# Altium PCB CW341_KintexUSTarget.PcbDoc (part 6 of 7)
Units mil, origin at the board's own origin, x right, y up, seen from the top; angles counter-clockwise.
Board outline 4566.97 x 5485 mil, 6 copper layers (Top Layer, Layer 2 (GND), Layer 3 (sig), Layer 4 (sig), Layer 5 (PWR), Bottom Layer), stack 61.068 mil thick; 157 components, 262 nets, 1869 pads, 1478 vias.
Unrouted connection lines stored in the file: 128.
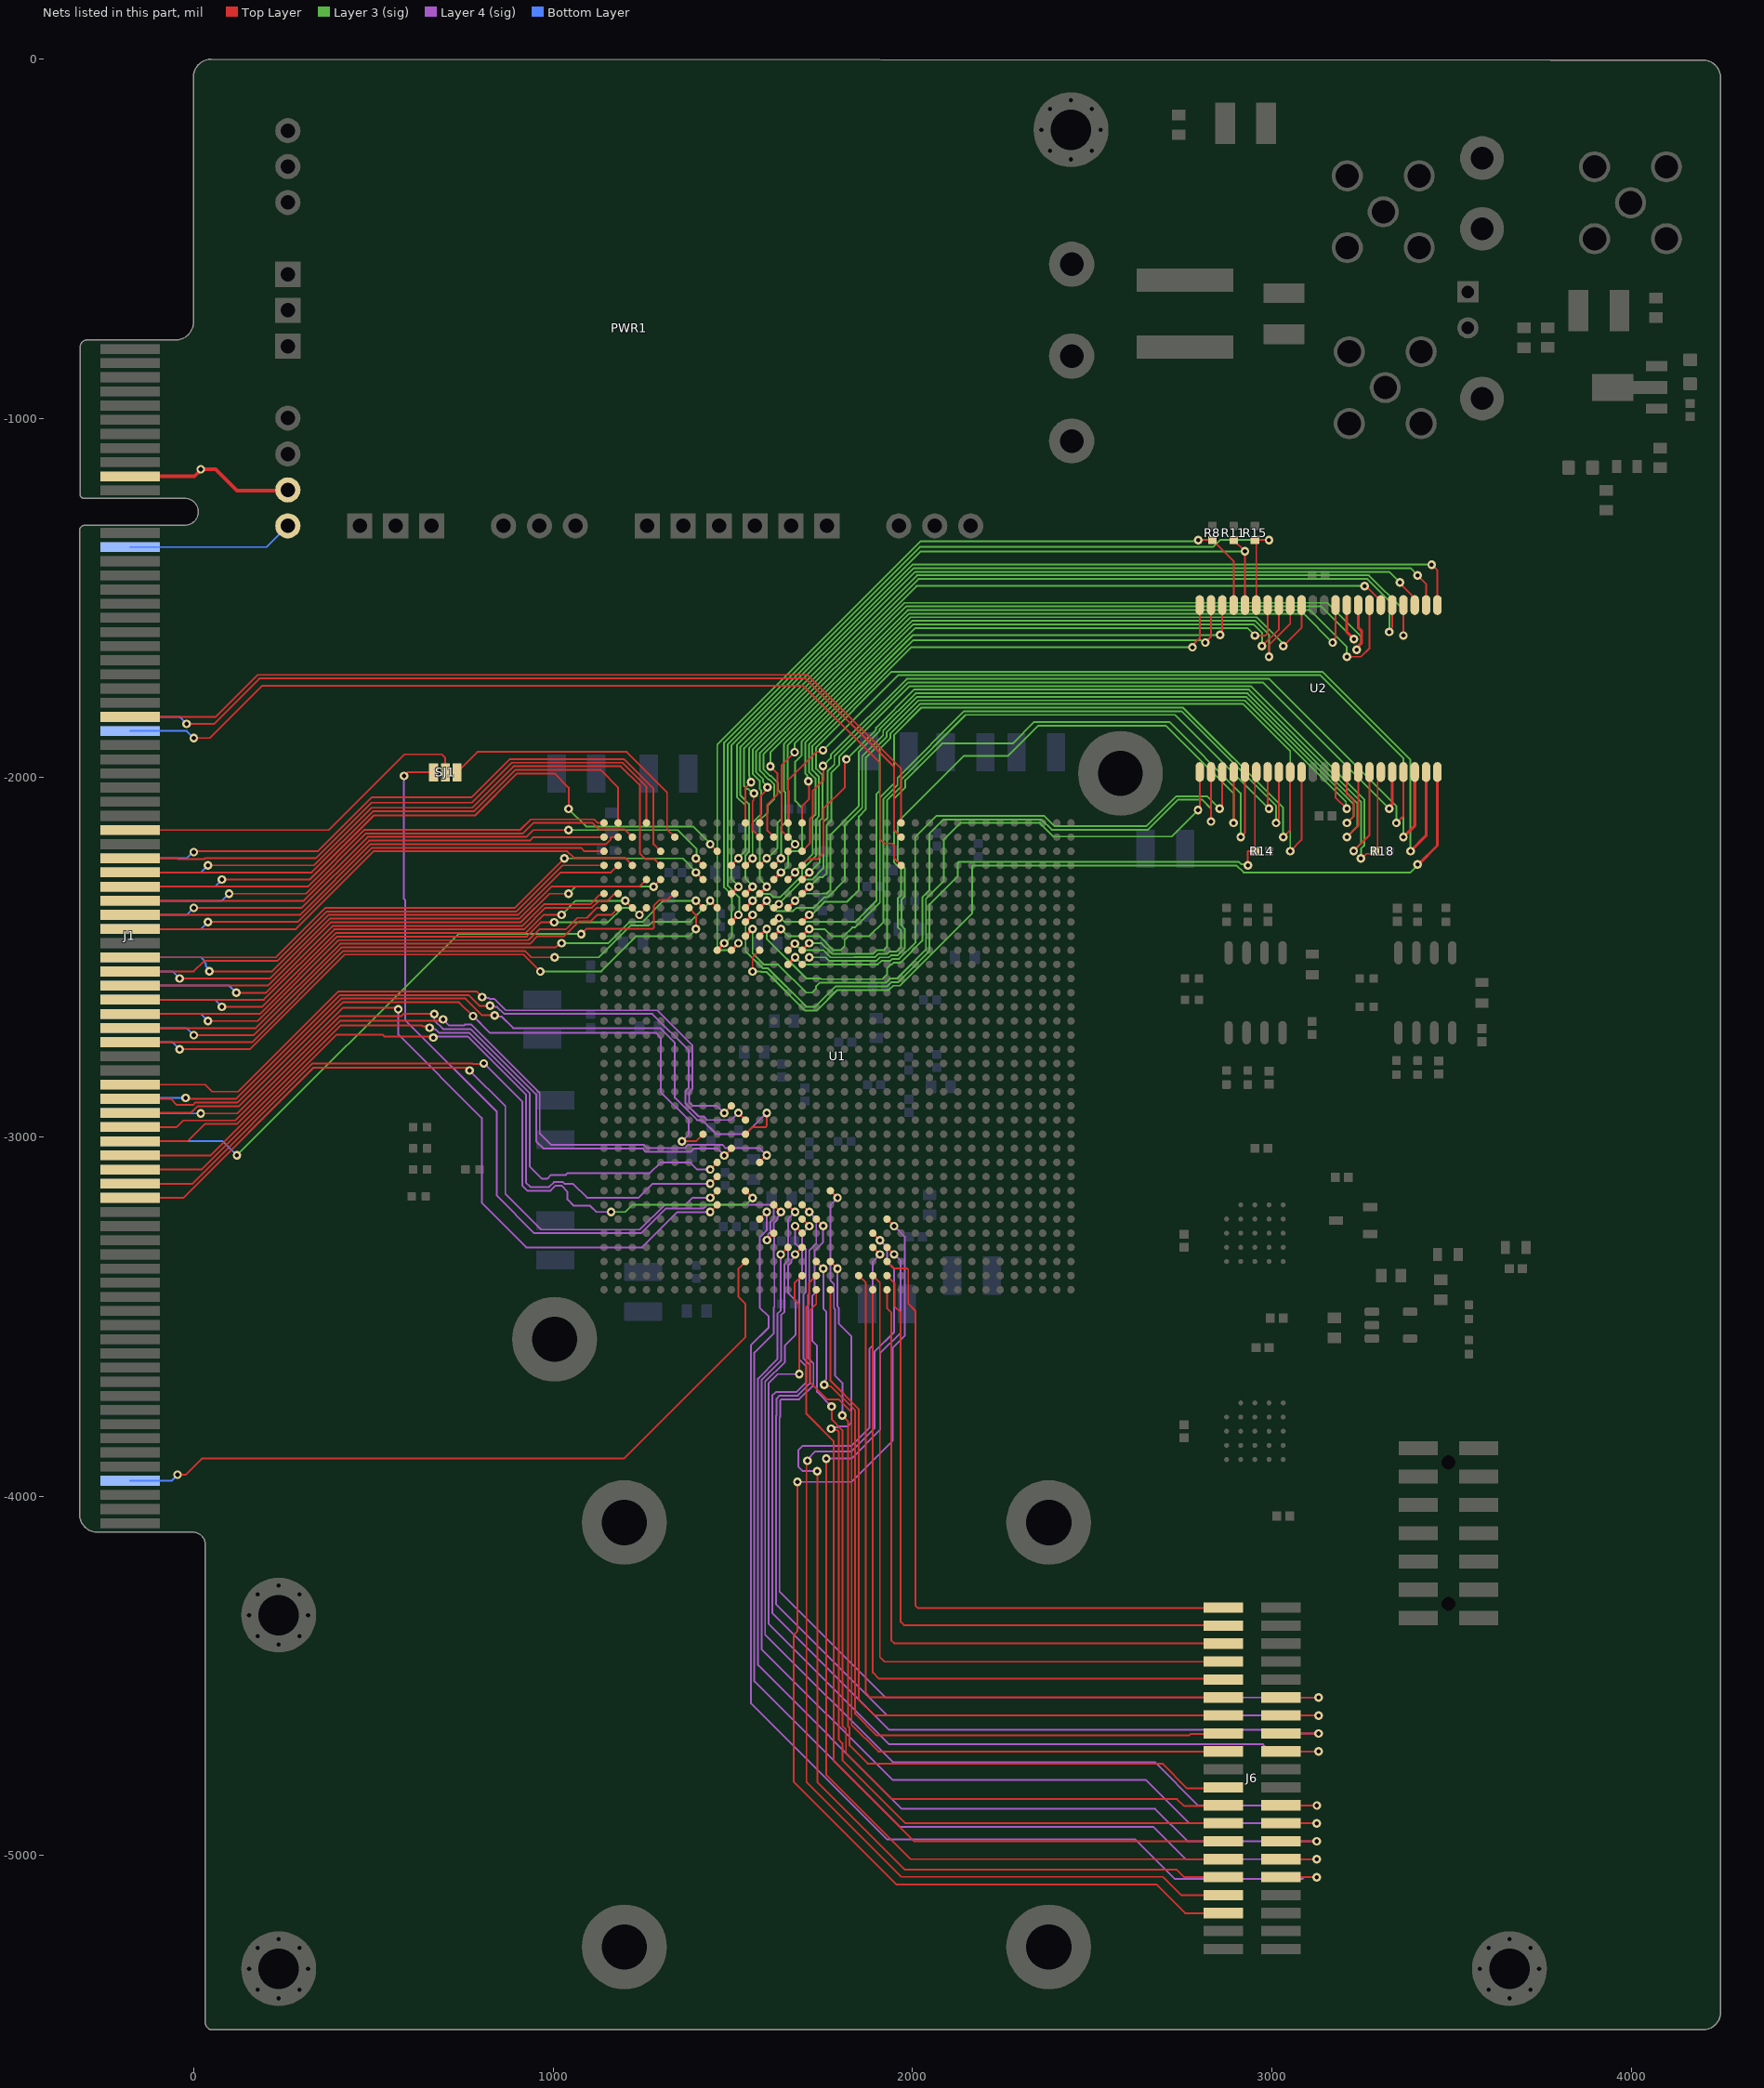
[diagram p9: the nets of this part, all layers, seen from the top]

## Via types
v1: diameter 24, hole 12, Top Layer to Bottom Layer, tented both sides, 1463 vias
v2: diameter 24, hole 10, Top Layer to Bottom Layer, tented both sides, 15 vias

## Nets (pads, with @x,y where several pads share a name; then routed paths per layer and width w, separated by ;. In a path a pad name is that pad's centre, name@x,y a point inside that pad or via, vN(x,y) a via of type N, cw(c..) or ccw(c..) an arc to the next point about the centre after c; other vN are vias at no path point) (continued)
OT_IOC3: J1.B51 U1.P25 | length 2050.2
  Top Layer w5: J1.B51@-177.17,-2854.33 31.48,-2854.33 50.98,-2873.83 123.74,-2873.83 402.57,-2595 786.78,-2595 v1(802.33,-2610.56) ; v1(1476.38,-2933.07) U1.P25@1496.06,-2913.39
  Layer 4 (sig) w5: v1(802.33,-2610.56) 805.33,-2613.56 821.83,-2613.56 823.62,-2615.34 835.8,-2615.34 867.96,-2647.51 1289.92,-2647.51 1387.77,-2745.36 1387.77,-2866.55 1378.14,-2876.18 1378.14,-2901.78 1389.93,-2913.57 1456.88,-2913.57 v1(1476.38,-2933.07)
OT_IOC4: J1.A52 U1.N24 | length 2094.2
  Top Layer w5: v1(-22.12,-2891.26) -19.69,-2893.7 118.01,-2893.7 406.72,-2605 765.16,-2605 795,-2634.84 v1(824.8,-2634.84) ; v1(1515.49,-2932.81) U1.N24@1535.43,-2952.76
  Layer 4 (sig) w5: v1(824.8,-2634.84) 827.95,-2637.99 844.3,-2637.99 863.98,-2657.67 1276.25,-2657.67 1377.77,-2759.19 1377.77,-2862.41 1368.14,-2872.04 1368.14,-2905.92 1405.16,-2942.94 1418.72,-2942.94 1428.35,-2952.57 1495.73,-2952.57 v1(1515.49,-2932.81)
  Bottom Layer w5: J1.A52@-177.17,-2893.7 -174.73,-2891.26 v1(-22.12,-2891.26)
OT_IOC5: J1.B52 U1.M24 | length 2275.8
  Top Layer w5: J1.B52@-177.17,-2893.7 -64.05,-2893.7 -46.99,-2910.76 -2.06,-2910.76 5,-2903.7 122.16,-2903.7 410.86,-2615 756.37,-2615 802.78,-2661.42 v1(837.6,-2661.42) ; U1.M24@1535.43,-2992.13 1555.12,-2972.44 1591.56,-2972.44 1594.49,-2969.51 v1(1594.49,-2933.07)
  Layer 4 (sig) w5: v1(837.6,-2661.42) 841.11,-2664.93 857.1,-2664.93 889.02,-2696.85 1297.24,-2696.85 1338.77,-2738.37 1338.77,-2890.69 1401.02,-2952.94 1414.58,-2952.94 1453.58,-2991.94 1535.62,-2991.94 v1(1594.49,-2933.07)
OT_IOC6: J1.B53 U1.M27 | length 2041
  Top Layer w5: J1.B53@-177.17,-2933.07 -8.07,-2933.07 10,-2915 125,-2915 415,-2625 738.21,-2625 776.69,-2663.48 v1(777.27,-2663.48) ; v1(1358.27,-3011.81) 1397.64,-3011.81 U1.M27@1417.32,-2992.13
  Layer 4 (sig) w5: v1(777.27,-2663.48) 823.74,-2709.95 1285.79,-2709.95 1299.4,-2723.56 1299.4,-2874.57 1377.77,-2952.94 1377.77,-2992.31 v1(1358.27,-3011.81)
OT_IOC7: J1.B54 U1.L25 | length 2071.7
  Top Layer w5: J1.B54@-177.17,-2972.44 -47.44,-2972.44 -29,-2954 116,-2954 406,-2664 577.26,-2664 583.78,-2657.48 v1(669.29,-2657.48) ; v1(1476.06,-3051.44) 1477.17,-3052.55 1477.41,-3052.55 1496.06,-3033.89 U1.L25@1496.06,-3031.5
  Layer 4 (sig) w5: v1(669.29,-2657.48) 669.29,-2675.4 693.67,-2699.78 770.64,-2699.78 952.88,-2882.01 952.88,-3011.48 973.07,-3031.68 1248.23,-3031.68 1257.86,-3041.31 1382.75,-3041.31 1392.33,-3031.73 1456.35,-3031.73 v1(1476.06,-3051.44)
OT_IOC8: J1.B55 U1.K23 | length 2173.6
  Top Layer w5: J1.B55@-177.17,-3011.81 -16.81,-3011.81 31,-2964 120.14,-2964 407.69,-2676.45 660.69,-2676.45 661.21,-2676.98 677.37,-2676.98 678.13,-2676.22 690.41,-2676.22 v1(694.05,-2672.58) ; U1.K23@1574.8,-3070.87 v1(1594.51,-3051.18)
  Layer 4 (sig) w5: v1(694.05,-2672.58) 711.24,-2689.78 752.17,-2689.78 755.1,-2686.85 771.86,-2686.85 962.88,-2877.87 962.88,-2990.43 994.12,-3021.68 1252.38,-3021.68 1262.01,-3031.31 1366.34,-3031.31 1375.93,-3021.73 1470.49,-3021.73 1480.07,-3031.31 1574.63,-3031.31 v1(1594.51,-3051.18)
OT_IOC9: J1.B56 U1.K26 | length 2115
  Top Layer w5: J1.B56@-177.17,-3051.18 47.1,-3051.18 409.31,-2688.98 634.71,-2688.98 638.05,-2692.32 653.08,-2692.32 v1(656.71,-2695.95) ; v1(1437.01,-3090.55) U1.K26@1456.69,-3070.87
  Layer 4 (sig) w5: v1(656.71,-2695.95) 660.35,-2699.59 671.04,-2699.59 672.5,-2701.04 673.49,-2701.04 682.22,-2709.78 766.5,-2709.78 934.57,-2877.84 934.57,-3082.03 968.31,-3115.77 984.22,-3115.77 994.5,-3105.5 1035.71,-3105.5 1040.92,-3100.29 1269.79,-3100.29 1299.03,-3071.05 1381.28,-3071.05 1400.78,-3090.55 v1(1437.01,-3090.55)
OT_IOC10: J1.B57 U1.J26 | length 2159.4
  Top Layer w5: J1.B57@-177.17,-3090.55 21.87,-3090.55 397.43,-2715 526.08,-2715 531.62,-2720.54 663.63,-2720.54 v1(666.38,-2723.29) ; v1(1437.01,-3130.05) 1437.01,-3129.99 1456.69,-3110.3 U1.J26@1456.69,-3110.24
  Layer 4 (sig) w5: v1(666.38,-2723.29) 669.13,-2720.54 763.12,-2720.54 924.57,-2881.98 924.57,-3127.18 936.8,-3139.42 988.86,-3139.42 1002.78,-3125.5 1027.22,-3125.5 1032.22,-3130.5 1055.68,-3130.5 1094.29,-3169.11 1237.99,-3169.11 1277.05,-3130.05 v1(1437.01,-3130.05)
OT_IOC11: J1.B58 U1.H24 | length 2247.7
  Top Layer w5: J1.B58@-177.17,-3129.92 -3.35,-3129.92 331.11,-2795.46 775.79,-2795.46 777.5,-2797.17 v1@807.09,-2797.17 ; U1.H24@1535.43,-3149.61 1535.43,-3149.79 1555.12,-3169.48 v1(1555.12,-3169.66)
  Layer 4 (sig) w5: v1(807.09,-2795.28) 914.57,-2902.76 914.57,-3135.81 928.18,-3149.42 993,-3149.42 1006.92,-3135.5 1023.08,-3135.5 1040.2,-3152.62 1040.2,-3174.08 1057.32,-3191.2 1102.6,-3191.2 1120.07,-3208.66 v1(1161.42,-3208.66)
  Layer 3 (sig) w5: v1(1161.42,-3208.66) 1200.79,-3208.66 1220.29,-3189.16 1535.25,-3189.16 1554.75,-3169.66 v1(1555.12,-3169.66)
OT_IOC12: J1.B59 U1.H26 | length 2155.5
  Top Layer w5: J1.B59@-177.17,-3169.29 -28.58,-3169.29 333.54,-2807.17 v1@767.72,-2807.17 ; v1(1437.5,-3169.38) 1437.5,-3169.09 1456.69,-3149.89 U1.H26@1456.69,-3149.61
  Layer 4 (sig) w5: v1(767.72,-2814.96) 867.19,-2914.43 867.19,-3158.24 966.66,-3257.72 1241.19,-3257.72 1310.11,-3188.79 1368.14,-3188.79 1387.88,-3169.05 1437.17,-3169.05 v1(1437.5,-3169.38)
OT_IOR0_USR_DBG_TMS: J1.A42 U1.AL33 | length 1505.8
  Top Layer w5: v1(43.32,-2539.19) 217.5,-2539.19 374.48,-2382.2 902.19,-2382.2 1020.43,-2263.96 1161.23,-2263.96 U1.AL33@1181.1,-2244.09
  Bottom Layer w5: J1.A42@-177.17,-2500 19.69,-2500 30.69,-2511.01 30.69,-2514.55 33.77,-2517.62 33.77,-2524.5 43.32,-2534.04 v1(43.32,-2539.19)
OT_IOR1_USR_DBG_TDO: J1.B42 U1.AK27 | length 1734.2
  Top Layer w5: J1.B42@-177.17,-2500 228.4,-2500 366.19,-2362.2 893.9,-2362.2 v1(1031.51,-2224.59) ; v1(1397.64,-2263.78) U1.AK27@1417.32,-2283.46
  Layer 3 (sig) w5: v1(1031.51,-2224.59) 1360.54,-2224.59 1397.64,-2261.69 v1(1397.64,-2263.78)
OT_IOR2_USR_DBG_TDI: J1.A43 U1.AK31 | length 1559.3
  Top Layer w5: v1(-39.37,-2559.06) 211.77,-2559.06 378.62,-2392.2 906.33,-2392.2 995.39,-2303.15 1240.16,-2303.15 U1.AK31@1259.84,-2283.46
  Bottom Layer w5: J1.A43@-177.17,-2539.37 -59.06,-2539.37 v1(-39.37,-2559.06)
OT_IOR3_USR_DBG_TCK: J1.B43 U1.AL34 | length 1441.2
  Top Layer w5: J1.B43@-177.17,-2539.37 0,-2539.37 29.37,-2510 232.54,-2510 370.34,-2372.2 898.05,-2372.2 1026.16,-2244.09 U1.AL34@1141.73,-2244.09
OT_IOR4_USR_DBG_TRST: J1.A44 U1.AJ34 | length 1441.2
  Top Layer w5: v1(118.11,-2598.43) 200.68,-2598.43 386.91,-2412.2 914.61,-2412.2 974.61,-2352.2 1103.76,-2352.2 1130.1,-2325.87 1138.7,-2325.87 U1.AJ34@1141.73,-2322.83
  Bottom Layer w5: J1.A44@-177.17,-2578.74 98.43,-2578.74 v1(118.11,-2598.43)
OT_IOR5: J1.B44 U1.AK30 | length 1598.7
  Top Layer w5: J1.B44@-177.17,-2578.74 206.23,-2578.74 382.76,-2402.2 910.47,-2402.2 989.84,-2322.83 v1(1043.31,-2322.83) ; v1(1279.53,-2303.15) U1.AK30@1299.21,-2283.46
  Layer 3 (sig) w5: v1(1043.31,-2322.83) 1062.99,-2303.15 v1(1279.53,-2303.15)
OT_IOR6: J1.A45 U1.AH32 | length 1536.3
  Top Layer w5: v1(78.74,-2637.8) 189.6,-2637.8 395.19,-2432.2 922.9,-2432.2 973.21,-2381.89 v1(1023.62,-2381.89) ; v1(1200.79,-2342.52) U1.AH32@1220.47,-2362.2
  Layer 3 (sig) w5: v1(1023.62,-2381.89) 1062.99,-2342.52 v1(1200.79,-2342.52)
  Bottom Layer w5: J1.A45@-177.17,-2618.11 59.06,-2618.11 v1(78.74,-2637.8)
OT_IOR7: J1.B45 U1.AJ33 | length 1480.6
  Top Layer w5: J1.B45@-177.17,-2618.11 195.14,-2618.11 391.05,-2422.2 918.76,-2422.2 978.76,-2362.2 1107.91,-2362.2 1125.84,-2344.27 1149.16,-2344.27 1168.17,-2325.26 1178.67,-2325.26 U1.AJ33@1181.1,-2322.83
OT_IOR8: J1.A46 U1.AH34 | length 1457.5
  Top Layer w5: v1(39.37,-2677.17) 178.51,-2677.17 403.47,-2452.2 931.18,-2452.2 961.49,-2421.9 1035.89,-2421.9 1067.62,-2390.16 1094.09,-2390.16 1122.05,-2362.2 U1.AH34@1141.73,-2362.2
  Bottom Layer w5: J1.A46@-177.17,-2657.48 19.69,-2657.48 v1(39.37,-2677.17)
OT_IOR9: J1.B46 U1.AH31 | length 1575.5
  Top Layer w5: J1.B46@-177.17,-2657.48 184.06,-2657.48 399.33,-2442.2 927.04,-2442.2 966.85,-2402.4 v1(1003.12,-2402.4) ; v1(1240.16,-2381.89) U1.AH31@1259.84,-2362.2
  Layer 3 (sig) w5: v1(1003.12,-2402.4) 1152.7,-2402.4 1192.71,-2362.39 1220.66,-2362.39 v1(1240.16,-2381.89)
OT_IOR10: J1.A47 U1.AH27 | length 1767.4
  Top Layer w5: v1(0,-2716.54) 167.43,-2716.54 411.76,-2472.2 1007.62,-2472.2 1019.19,-2460.63 v1(1023.62,-2460.63) ; v1(1397.64,-2342.52) 1414.43,-2359.31 1414.43,-2362.2 U1.AH27@1417.32,-2362.2
  Layer 3 (sig) w5: v1(1023.62,-2460.63) 1152.62,-2460.63 1211.86,-2401.39 1248.23,-2401.39 1307.1,-2342.52 v1(1397.64,-2342.52)
  Bottom Layer w5: J1.A47@-177.17,-2696.85 -19.68,-2696.85 v1(0,-2716.54)
OT_IOR11: J1.B47 U1.AH33 | length 1496.9
  Top Layer w5: J1.B47@-177.17,-2696.85 172.97,-2696.85 407.62,-2462.2 935.32,-2462.2 956.58,-2440.95 1030.98,-2440.95 1071.76,-2400.16 1103.78,-2400.16 1122.05,-2381.89 1161.42,-2381.89 U1.AH33@1181.1,-2362.2
OT_IOR12: J1.A48 U1.AH28 | length 1828.7
  Top Layer w5: v1(-39.37,-2755.91) 156.34,-2755.91 420.04,-2492.2 917.4,-2492.2 v1(964.57,-2539.37) ; U1.AH28@1377.95,-2362.2 1397.64,-2381.89 v1(1397.64,-2421.26)
  Layer 3 (sig) w5: v1(964.57,-2539.37) 1133.84,-2539.37 1232.08,-2441.13 1379.28,-2441.13 1397.64,-2422.77 v1(1397.64,-2421.26)
  Bottom Layer w5: J1.A48@-177.17,-2736.22 -59.05,-2736.22 v1(-39.37,-2755.91)
OT_IOR13: J1.B48 U1.AH26 | length 1801.4
  Top Layer w5: J1.B48@-157.48,-2736.22 161.88,-2736.22 415.9,-2482.2 921.54,-2482.2 939.34,-2500 v1(1003.94,-2500) ; v1(1437.01,-2342.52) U1.AH26@1456.69,-2362.2
  Layer 3 (sig) w5: v1(1003.94,-2500) 1127.39,-2500 1216,-2411.39 1266.59,-2411.39 1276.59,-2401.39 1380.23,-2401.39 1437.01,-2344.61 v1(1437.01,-2342.52)
OT_PORN: J1.A53 U1.G26 | length 2258.4
  Top Layer w5: v1(19.68,-2934.5) 121.36,-2934.5 415.86,-2640 v1@568.17,-2640 ; v1(1437.01,-3208.66) U1.G26@1456.69,-3188.98
  Layer 4 (sig) w5: v1(569.18,-2644.5) 569.18,-2714.85 801.33,-2947 801.33,-3183.22 925.2,-3307.09 1247.43,-3307.09 1345.72,-3208.79 1436.88,-3208.79 v1(1437.01,-3208.66)
  Bottom Layer w5: J1.A53@-177.17,-2933.07 -175.74,-2934.5 v1(19.68,-2934.5)
OT_SPI_DEV_CLK: J1.A35 U1.AM30 | length 1787.2
  Top Layer w5: v1(0,-2207.04) 2.31,-2204.72 345.16,-2204.72 494.94,-2054.94 773.25,-2054.94 880,-1948.19 1196.53,-1948.19 1279.53,-2031.18 1279.53,-2185.04 U1.AM30@1299.21,-2204.72
  Bottom Layer w5: J1.A35@-177.17,-2224.41 -19.69,-2224.41 -2.31,-2207.04 v1(0,-2207.04)
OT_SPI_DEV_CS_L: J1.A40 U1.AM34 | length 1416.6
  Top Layer w5: v1(39.37,-2401.57) 289.73,-2401.57 496.21,-2195.09 1077.78,-2195.09 1087.41,-2204.72 U1.AM34@1141.73,-2204.72
  Bottom Layer w5: J1.A40@-177.17,-2421.26 19.68,-2421.26 v1(39.37,-2401.57)
OT_SPI_DEV_D0: J1.A36 U1.AL30 | length 1824.8
  Top Layer w5: v1(39.37,-2244.09) 334.08,-2244.09 494.51,-2083.66 775,-2083.66 890,-1968.66 890,-1968.19 1188.25,-1968.19 1241.91,-2021.85 1241.91,-2212.15 1255.92,-2226.16 1281.28,-2226.16 U1.AL30@1299.21,-2244.09
  Bottom Layer w5: J1.A36@-177.17,-2263.78 19.69,-2263.78 v1(39.37,-2244.09)
OT_SPI_DEV_D1: J1.A37 U1.AM26 | length 1890.1
  Top Layer w5: v1(78.74,-2283.46) 322.99,-2283.46 501.45,-2105 783.19,-2105 900,-1988.19 1003.94,-1988.19 1043.31,-2027.56 v1(1043.31,-2087.06) ; v1(1437.01,-2185.04) U1.AM26@1456.69,-2204.72
  Layer 3 (sig) w5: v1(1043.31,-2087.06) 1091.92,-2135.67 1389.73,-2135.67 1437.01,-2182.95 v1(1437.01,-2185.04)
  Bottom Layer w5: J1.A37@-177.17,-2303.15 59.06,-2303.15 v1(78.74,-2283.46)
OT_SPI_DEV_D2: J1.A38 U1.AN32 | length 1503.6
  Top Layer w5: v1(98.43,-2322.83) 311.9,-2322.83 479.7,-2155.04 915.83,-2155.04 944.88,-2125.98 1110.06,-2125.98 1127.99,-2143.92 1199.04,-2143.92 U1.AN32@1220.47,-2165.35
  Bottom Layer w5: J1.A38@-177.17,-2342.52 78.74,-2342.52 v1(98.43,-2322.83)
OT_SPI_DEV_D3: J1.A39 U1.AN34 | length 1408.6
  Top Layer w5: v1(0,-2362.2) 300.82,-2362.2 487.98,-2175.04 935.2,-2175.04 944.88,-2165.35 U1.AN34@1141.73,-2165.35
  Bottom Layer w5: J1.A39@-177.17,-2381.89 -19.69,-2381.89 v1(0,-2362.2)
OT_SPI_HOST_CLK: J1.B35 U1.AP31 | length 1677.3
  Top Layer w5: J1.B35@-177.17,-2224.41 -45.52,-2224.41 -43.39,-2226.54 29.35,-2226.54 31.48,-2224.41 339.62,-2224.41 494.51,-2069.51 773.67,-2069.51 885,-1958.19 1192.39,-1958.19 1259.84,-2025.64 U1.AP31@1259.84,-2125.98
OT_SPI_HOST_CS_L: J1.B40 U1.AL32 | length 1503.3
  Top Layer w5: J1.B40@-177.17,-2421.26 284.19,-2421.26 500.36,-2205.09 1039.59,-2205.09 1057.15,-2222.66 1199.04,-2222.66 U1.AL32@1220.47,-2244.09
OT_SPI_HOST_D0: J1.B36 U1.AP33 | length 1595.4
  Top Layer w5: J1.B36@-177.17,-2263.78 328.53,-2263.78 498.66,-2093.66 779.53,-2093.66 895,-1978.19 1131.73,-1978.19 1181.1,-2027.56 U1.AP33@1181.1,-2125.98
OT_SPI_HOST_D1: J1.B37 U1.AP34 | length 1400.6
  Top Layer w5: J1.B37@-177.17,-2303.15 317.45,-2303.15 475.56,-2145.04 909.2,-2145.04 938.25,-2115.98 1114.2,-2115.98 1123.8,-2125.58 1141.33,-2125.58 U1.AP34@1141.73,-2125.98
OT_SPI_HOST_D2: J1.B38 U1.AL27 | length 1734.7
  Top Layer w5: J1.B38@-177.17,-2342.52 306.36,-2342.52 483.84,-2165.04 925.51,-2165.04 944.88,-2145.67 v1(1043.31,-2145.67) ; v1(1397.64,-2224.41) U1.AL27@1417.32,-2244.09
  Layer 3 (sig) w5: v1(1043.31,-2145.67) 1346.47,-2145.67 1399.73,-2198.92 1399.73,-2222.32 v1(1397.64,-2224.41)
OT_SPI_HOST_D3: J1.B39 U1.AN33 | length 1450.6
  Top Layer w5: J1.B39@-177.17,-2381.89 295.28,-2381.89 492.13,-2185.04 1147.41,-2185.04 1159.67,-2172.78 1159.67,-2168.28 1162.59,-2165.35 U1.AN33@1181.1,-2165.35
PGOOD_VCCINT: J1.B10 PWR1.9 | length 473.6
  Top Layer w10: J1.B10@-177.17,-1161.42 2.09,-1161.42 19.68,-1143.82 v1(19.68,-1141.73) 61.14,-1141.73 120.2,-1200.79 200.43,-1200.79 260.36,-1200.79 PWR1.9@261.93,-1199.21
PLL2_CLK_ALT: SJ1.3 U1.E22 | length 2334.1
  Top Layer w5: v1(585,-1995) 595,-1985 SJ1.3@667.56,-1985 ; v1(1595.15,-3286.74) U1.E22@1614.17,-3267.72
  Layer 4 (sig) w5: v1(585,-1995) 585,-2337.7 588.68,-2341.38 588.68,-2675.3 843.39,-2930 843.39,-3163.39 947.72,-3267.72 1245.33,-3267.72 1314.25,-3198.79 1419.3,-3198.79 1428.93,-3189.16 1602.57,-3189.16 1613.99,-3200.58 1613.99,-3226.18 1604.36,-3235.81 1604.36,-3263.98 1598.79,-3269.55 1598.79,-3283.1 v1(1595.15,-3286.74)
PLL_CLK1: J1.A55 U1.AJ29 | length 1869.9
  Top Layer w5: v1(1078.38,-2435.26) 1093.48,-2420.16 1277.7,-2420.16 1280.63,-2417.23 1280.63,-2355.43 1295.29,-2340.77 1316.94,-2340.77 1334.87,-2322.83 U1.AJ29@1338.58,-2322.83
  Layer 3 (sig) w5: v1(120.2,-3051.18) 736.12,-2435.26 v1(1078.38,-2435.26)
  Bottom Layer w5: J1.A55@-177.17,-3011.81 80.83,-3011.81 v1(120.2,-3051.18)
PLL_CLK2: J1.B33 SJ1.2 | length 1008.5
  Top Layer w5: J1.B33@-177.17,-2145.67 375.93,-2145.67 586.6,-1935 689.84,-1935 700,-1945.16 SJ1.2@700,-1985
PLL_CLK2_ORIG: SJ1.1 U1.AN29 | length 788.5
  Top Layer w5: SJ1.1@732.43,-1985 789.24,-1928.19 1204.82,-1928.19 1317.15,-2040.52 1317.15,-2143.92 U1.AN29@1338.58,-2165.35
PMOD2_IO4_3V3: J1.A25 U1.AN13 | length 2492.2
  Top Layer w5: v1(-19.69,-1850.39) 56,-1850.39 182.53,-1723.86 1703.03,-1723.86 1948.82,-1969.64 1948.82,-2145.67 U1.AN13@1968.5,-2165.35
  Bottom Layer w5: J1.A25@-177.17,-1830.71 -39.37,-1830.71 v1(-19.69,-1850.39)
PMOD2_IO7_3V3: J1.B25 U1.AP13 | length 2453.1
  Top Layer w5: J1.B25@-177.17,-1830.71 61.54,-1830.71 178.39,-1713.86 1707.18,-1713.86 1968.5,-1975.19 U1.AP13@1968.5,-2125.98
PMOD2_IO8_3V3: J1.A26 U1.AL13 | length 2567.3
  Top Layer w5: v1(0,-1889.76) 44.91,-1889.76 190.82,-1743.86 1694.75,-1743.86 1909.45,-1958.56 1909.45,-2171.03 1921.71,-2183.29 1944.14,-2183.29 1948.82,-2187.97 1948.82,-2224.28 1957.07,-2232.52 1957.07,-2232.66 U1.AL13@1968.5,-2244.09
  Bottom Layer w5: J1.A26@-177.17,-1870.08 -19.69,-1870.08 v1(0,-1889.76)
PWR_EN: J1.A13 PWR1.10 | length 463.6
  Bottom Layer w5: J1.A13@-177.17,-1358.27 202.87,-1358.27 PWR1.10@261.93,-1299.21
SRAM_A0: U1.AE21 U2.5 | length 2233.3
  Top Layer w5: v1(2913.39,-2165.35) 2925.2,-2153.54 U2.5@2925.2,-1984.25
  Top Layer w8: U1.AE21@1653.54,-2480.32 1653.85,-2480.32 v1(1672.4,-2461.76)
  Layer 3 (sig) w5: v1(1672.4,-2461.76) 1691.14,-2480.5 1752.38,-2480.5 1772.01,-2500.13 1837.61,-2500.13 1837.87,-2499.87 1895.18,-2499.87 1904.92,-2490.13 1930.14,-2490.13 1935.86,-2484.42 1954.7,-2484.42 1968.32,-2470.8 1968.32,-2424.9 1958.98,-2415.56 1958.98,-2336.16 1968.32,-2326.81 1968.32,-2255.49 1949.14,-2236.31 1949.14,-2057.75 1979.9,-2026.98 1979.9,-2007.18 2082.08,-1905 2278.66,-1905 2338.66,-1845 2715,-1845 2913.39,-2043.39 v1(2913.39,-2165.35)
SRAM_A1: U1.AD20 U2.4 | length 2027.4
  Top Layer w5: U1.AD20@1692.91,-2519.69 v1(1712.6,-2500) ; v1(2893.7,-2125.98) U2.4@2893.7,-1984.25
  Layer 3 (sig) w5: v1(1712.6,-2500) 1757.74,-2500 1767.87,-2510.13 1841.75,-2510.13 1842.01,-2509.87 1899.32,-2509.87 1909.06,-2500.13 1934.29,-2500.13 1940,-2494.42 1958.84,-2494.42 1978.32,-2474.94 1978.32,-2420.76 1968.98,-2411.42 1968.98,-2340.3 1978.32,-2330.96 1978.32,-2251.35 1959.14,-2232.16 1959.14,-2123.56 2143.45,-1939.25 2265.75,-1939.25 2350,-1855 2705,-1855 2893.7,-2043.7 v1(2893.7,-2125.98)
SRAM_A2: U1.AD21 U2.3 | length 1728.3
  Top Layer w5: v1(2854.33,-2086.61) 2862.2,-2078.74 U2.3@2862.2,-1984.25
  Top Layer w8: U1.AD21@1653.54,-2519.69 v1(1673.23,-2500)
  Layer 3 (sig) w5: v1(1673.23,-2500) 1692.87,-2519.64 1763.24,-2519.64 1763.73,-2520.13 1845.89,-2520.13 1846.15,-2519.87 1903.46,-2519.87 1913.2,-2510.13 1938.43,-2510.13 1944.14,-2504.42 1962.98,-2504.42 2008.06,-2459.34 2008.06,-2266.95 2007.69,-2266.58 2007.69,-2165.17 2066.69,-2106.17 2366.17,-2106.17 2395,-2135 2650.86,-2135 2734.35,-2051.51 2819.22,-2051.51 v1(2854.33,-2086.61)
SRAM_A3: U1.AF23 U2.2 | length 1925.7
  Top Layer w5: v1(2830.71,-2122.05) U2.2@2830.71,-1984.25
  Top Layer w8: U1.AF23@1574.8,-2440.94 v1(1594.49,-2421.26)
  Layer 3 (sig) w5: v1(1594.49,-2421.26) 1594.49,-2448.84 1704.52,-2558.87 1743.89,-2558.87 1745.84,-2560.82 1915.58,-2560.82 1928.95,-2547.45 1928.95,-2531.66 1940.74,-2519.87 1942.83,-2519.87 1948.28,-2514.42 1967.12,-2514.42 2027.43,-2454.11 2027.43,-2332.94 2047.43,-2312.94 2047.43,-2154.92 2086.18,-2116.17 2358.64,-2116.17 2387.47,-2145 2655,-2145 2738.49,-2061.51 2806.51,-2061.51 2830.71,-2085.71 v1(2830.71,-2122.05)
SRAM_A4: U1.AF24 U2.1 | length 1883
  Top Layer w5: v1(2794.63,-2090.21) 2799.21,-2085.63 U2.1@2799.21,-1984.25
  Top Layer w8: U1.AF24@1535.43,-2440.94 v1(1555.12,-2421.26)
  Layer 3 (sig) w5: v1(1555.12,-2421.26) 1555.12,-2488.14 1587.42,-2520.45 1626.73,-2520.45 1704.52,-2598.24 1720.68,-2598.24 1732.1,-2586.82 1732.1,-2580.41 1741.69,-2570.82 1926.11,-2570.82 1938.06,-2558.87 1956.9,-2558.87 2037.43,-2478.34 2037.43,-2337.09 2086.8,-2287.72 2086.8,-2173.06 2133.69,-2126.17 2354.5,-2126.17 2392.15,-2163.82 2721.02,-2163.82 v1(2794.63,-2090.21)
SRAM_A5: U1.AH24 U2.44 | length 1886.5
  Top Layer w5: v1(2778.86,-1637.13) 2778.86,-1632.54 2799.21,-1612.19 U2.44@2799.21,-1519.69
  Top Layer w8: U1.AH24@1535.43,-2362.2 v1(1555.12,-2342.52)
  Layer 3 (sig) w5: v1(1555.12,-2342.52) 1574.62,-2323.02 1602.57,-2323.02 1611.83,-2332.28 1632.3,-2332.28 1692.89,-2271.7 1692.89,-2255.92 1731.84,-2216.96 1731.84,-2115.44 1739.79,-2107.49 1739.79,-1997.69 1721.65,-1979.55 1721.65,-1911.49 1996.01,-1637.13 v1(2778.86,-1637.13)
SRAM_A6: U1.AK21 U2.43 | length 1752
  Top Layer w5: U1.AK21@1653.54,-2283.46 1653.54,-2283.33 v1(1673.39,-2263.49) ; v1(2814.96,-1624.02) 2830.71,-1608.27 U2.43@2830.71,-1519.69
  Layer 3 (sig) w5: v1(1673.39,-2263.49) 1673.39,-2261.27 1721.84,-2212.82 1721.84,-2111.3 1729.79,-2103.35 1729.79,-2001.83 1711.65,-1983.69 1711.65,-1907.35 2001.37,-1617.63 2803.43,-1617.63 2809.82,-1624.02 v1(2814.96,-1624.02)
SRAM_A7: U1.AP20 U2.42 | length 1599.7
  Top Layer w5: U1.AP20@1692.91,-2125.98 1692.91,-2078.92 1712.41,-2059.42 1712.41,-2012.03 v1(1710.29,-2009.91) ; v1(2855.66,-1603) 2855.66,-1597.86 2862.2,-1591.32 U2.42@2862.2,-1519.69
  Layer 3 (sig) w5: v1(1710.29,-2009.91) 1706.65,-2006.27 1706.65,-1992.84 1701.65,-1987.83 1701.65,-1903.21 2001.85,-1603 v1(2855.66,-1603)
SRAM_A8: U1.AP24 U2.27 | length 2383.1
  Top Layer w5: U1.AP24@1535.43,-2125.98 1535.43,-2027.56 v1(1550.79,-2012.2) ; v1(3326.77,-1594.49) 3326.77,-1589.35 3334.65,-1581.47 U2.27@3334.65,-1519.69
  Layer 3 (sig) w5: v1(1550.79,-2012.2) 1547.15,-2008.57 1547.15,-1995.13 1545.17,-1993.15 1545.17,-1918.26 2016.4,-1447.04 3265.95,-1447.04 3326.77,-1507.86 v1(3326.77,-1594.49)
SRAM_A9: U1.AN23 U2.26 | length 2503
  Top Layer w5: v1(1559.06,-2043.3) 1557.62,-2044.74 1557.62,-2062.8 1555.12,-2065.3 1555.12,-2145.67 U1.AN23@1574.8,-2165.35 ; v1(3366.14,-1604.33) U2.26@3366.14,-1519.69
  Layer 3 (sig) w5: v1(1559.06,-2043.3) 1555,-2043.3 1543.25,-2031.54 1539.41,-2031.54 1531.29,-2023.42 1531.29,-1918 2012.26,-1437.04 3270.09,-1437.04 3366.14,-1533.08 v1(3366.14,-1604.33)
SRAM_A10: U1.AJ24 U2.25 | length 2568.1
  Top Layer w5: v1(3356.3,-1456.69) 3356.3,-1459.65 3397.64,-1500.98 U2.25@3397.64,-1519.69
  Top Layer w8: U1.AJ24@1535.43,-2322.83 v1(1555.12,-2303.15)
  Layer 3 (sig) w5: v1(1555.12,-2303.15) 1555.12,-2301.06 1535.59,-2281.53 1535.59,-2216.35 1545.09,-2206.85 1545.09,-2073.21 1521.29,-2049.41 1521.29,-1913.86 2008.12,-1427.04 3326.64,-1427.04 v1(3356.3,-1456.69)
SRAM_A11: U1.AL25 U2.24 | length 2559.4
  Top Layer w5: U1.AL25@1496.06,-2244.09 v1(1515.75,-2224.41) ; v1(3405.51,-1437.01) 3429.13,-1460.63 U2.24@3429.13,-1519.69
  Layer 3 (sig) w5: v1(1515.75,-2224.41) 1515.75,-2222.05 1535.09,-2202.7 1535.09,-2077.35 1511.29,-2053.55 1511.29,-1909.72 2003.97,-1417.04 3385.54,-1417.04 v1(3405.51,-1437.01)
SRAM_A12: U1.AE23 U2.22 | length 2506.9
  Top Layer w5: v1(1555.12,-2539.37) 1555.12,-2500 U1.AE23@1574.8,-2480.32
  Top Layer w8: v1(3405.51,-2241.78) 3407.83,-2241.78 3460.63,-2188.98 U2.22@3460.63,-1984.25
  Layer 3 (sig) w5: v1(1555.12,-2539.37) 1578.06,-2539.37 1579.14,-2540.45 1593.22,-2540.45 1700.38,-2647.61 1734.26,-2647.61 1791.06,-2590.82 1934.39,-2590.82 1946.34,-2578.87 1965.18,-2578.87 2165.54,-2378.51 2165.54,-2247.09 2168.47,-2244.16 2901.66,-2244.16 2921.28,-2263.78 3385.83,-2263.78 3405.51,-2244.09 v1(3405.51,-2241.78)
SRAM_A13: U1.AK20 U2.21 | length 2735.7
  Top Layer w8: U1.AK20@1692.91,-2283.46 v1(1712.64,-2263.74) ; v1(3385.83,-2204.72) 3429.13,-2161.42 U2.21@3429.13,-1984.25
  Layer 3 (sig) w5: v1(1712.64,-2263.74) 1714.69,-2263.74 1741.84,-2236.59 1741.84,-2119.59 1749.79,-2111.64 1749.79,-1993.55 1731.65,-1975.41 1731.65,-1915.63 1942.28,-1705 3140,-1705 3385.83,-1950.83 v1(3385.83,-2204.72)
SRAM_A14: U1.AP21 U2.20 | length 2461.1
  Top Layer w5: U1.AP21@1653.54,-2125.98 1653.54,-2007.87 1734.07,-1927.35 1747.51,-1927.35 v1(1751.15,-1923.71)
  Top Layer w8: v1(3366.14,-2165.35) 3397.64,-2133.86 U2.20@3397.64,-1984.25
  Layer 3 (sig) w5: v1(1751.15,-1923.71) 1959.86,-1715 3135,-1715 3366.14,-1946.14 v1(3366.14,-2165.35)
SRAM_A15: U1.AM20 U2.19 | length 2307.2
  Top Layer w5: U1.AM20@1692.91,-2204.72 1714.35,-2183.29 1714.35,-2114.39 1722.41,-2106.33 1722.41,-2037.43 1751.97,-2007.87 1751.97,-1968.15 v1(1751.15,-1967.33) ; v1(3346.46,-2125.98) 3366.14,-2106.3 U2.19@3366.14,-1984.25
  Layer 3 (sig) w5: v1(1751.15,-1967.33) 1772.6,-1945.88 1772.6,-1936.21 1983.81,-1725 2992.73,-1725 3346.46,-2078.72 v1(3346.46,-2125.98)
SRAM_A16: U1.AH22 U2.18 | length 2389
  Top Layer w8: U1.AH22@1614.17,-2362.2 1615.96,-2362.2 1626.38,-2351.78 v1(1628.17,-2351.78) ; v1(3326.77,-2086.61) 3326.77,-2082.28 3334.65,-2074.41 U2.18@3334.65,-1984.25
  Layer 3 (sig) w5: v1(1628.17,-2351.78) 1628.17,-2350.56 1695.08,-2283.65 1720.31,-2283.65 1751.84,-2252.12 1751.84,-2123.73 1763.93,-2111.64 1763.93,-1982.13 1782.6,-1963.45 1782.6,-1940.35 1987.96,-1735 2975.16,-1735 v1(3326.77,-2086.61)
SRAM_A17: U1.AJ25 U2.23 | length 2704.7
  Top Layer w5: v1(3444.65,-1407.48) 3444.88,-1407.48 3460.63,-1423.23 U2.23@3460.63,-1519.69
  Top Layer w8: U1.AJ25@1496.06,-2322.83 v1(1515.75,-2303.15)
  Layer 3 (sig) w5: v1(1515.75,-2303.15) 1515.75,-2301.06 1496.09,-2281.4 1496.09,-1910.78 1999.83,-1407.04 3444.21,-1407.04 v1(3444.65,-1407.48)
SRAM_A18: U1.AL24 U2.28 | length 2315
  Top Layer w5: U1.AL24@1535.43,-2244.09 v1(1555.09,-2224.42) ; v1(3257.87,-1466.54) 3261.81,-1466.54 3303.15,-1507.87 U2.28@3303.15,-1519.69
  Layer 3 (sig) w5: v1(1555.09,-2224.42) 1555.09,-2124.68 1578.56,-2101.21 1578.56,-2035.22 1574.62,-2031.28 1574.62,-2008.45 1555.17,-1989.01 1555.17,-1922.4 2011.04,-1466.54 v1(3257.87,-1466.54)
SRAM_C\S\1\: R14.2 U1.AG24 U2.6 | length 2148.5
  Top Layer w5: v1(2933.26,-2244.09) 2933.26,-2204.2 2952.23,-2204.2 R14.2@2952.76,-2204.72 ; R14.2@2952.94,-2204.2 2952.94,-2012.24 2953.13,-2012.05 2953.13,-1987.82 U2.6@2956.69,-1984.25
  Top Layer w8: U1.AG24@1535.43,-2401.57 v1(1555.12,-2381.89)
  Layer 3 (sig) w5: v1(1555.12,-2381.89) 1555.12,-2383.98 1535.62,-2403.48 1535.62,-2482.78 1583.28,-2530.45 1597.36,-2530.45 1704.52,-2637.61 1730.12,-2637.61 1786.91,-2580.82 1930.25,-2580.82 1942.2,-2568.87 1961.04,-2568.87 2047.43,-2482.48 2047.43,-2352.31 2126.17,-2273.57 2126.17,-2237.09 2129.1,-2234.16 2908.18,-2234.16 2914.48,-2240.46 2929.62,-2240.46 v1(2933.26,-2244.09)
SRAM_DQ0: U1.AE20 U2.7 | length 2057.5
  Top Layer w5: U2.7@2988.19,-1984.25 2988.19,-2082.68 v1(2992.13,-2086.61)
  Top Layer w8: U1.AE20@1692.91,-2480.32 v1(1712.6,-2460.63)
  Layer 3 (sig) w5: v1(1712.6,-2460.63) 1746.65,-2460.63 1776.15,-2490.13 1833.46,-2490.13 1833.72,-2489.87 1891.03,-2489.87 1900.77,-2480.13 1919.61,-2480.13 1929.32,-2470.42 1929.32,-2063.42 1968.5,-2024.24 1968.5,-2004.44 2147.94,-1825 2730.51,-1825 v1(2992.13,-2086.61)
SRAM_DQ1: U1.AF22 U2.8 | length 2228.6
  Top Layer w5: v1(3011.81,-2125.98) 3011.81,-2120.84 3019.68,-2112.97 U2.8@3019.68,-1984.25
  Top Layer w8: U1.AF22@1614.17,-2440.94 v1(1633.86,-2421.26)
  Layer 3 (sig) w5: v1(1633.86,-2421.26) 1653.73,-2441.13 1741.29,-2441.13 1780.29,-2480.13 1799.42,-2480.13 1811.02,-2468.52 1811.02,-2452.74 1823,-2440.76 1880.24,-2440.76 1919.32,-2401.68 1919.32,-2059.28 1958.5,-2020.09 1958.5,-2000.29 2143.8,-1815 2748.09,-1815 3011.81,-2078.72 v1(3011.81,-2125.98)
SRAM_DQ2: U1.AF20 U2.9 | length 2254
  Top Layer w5: v1(3031.5,-2165.35) 3051.18,-2145.67 U2.9@3051.18,-1984.25
  Top Layer w8: U1.AF20@1692.91,-2440.94 v1(1712.6,-2421.26)
  Layer 3 (sig) w5: v1(1712.6,-2421.26) 1755.45,-2421.26 1774.95,-2440.76 1808.86,-2440.76 1832.74,-2416.88 1839.52,-2416.88 1909.32,-2347.09 1909.32,-2055.14 1948.5,-2015.95 1948.5,-1881.5 2025,-1805 2752.23,-1805 3031.5,-2084.27 v1(3031.5,-2165.35)
SRAM_DQ3: U1.AG22 U2.10 | length 2513.2
  Top Layer w5: v1(3051.18,-2204.72) 3082.68,-2173.23 U2.10@3082.68,-1984.25
  Top Layer w8: U1.AG22@1614.17,-2401.57 1615.85,-2401.57 1626.64,-2390.78 v1(1628.32,-2390.78)
  Layer 3 (sig) w5: v1(1628.32,-2390.78) 1633.46,-2390.78 1644.07,-2401.39 1840.87,-2401.39 1899.32,-2342.94 1899.32,-2045.58 1909.26,-2035.64 1909.26,-1919.02 1938.5,-1889.78 1938.5,-1877.35 2020.86,-1795 2920,-1795 3051.18,-1926.18 v1(3051.18,-2204.72)
SRAM_DQ4: U1.AG20 U2.13 | length 2233.3
  Top Layer w5: U2.13@3177.17,-1984.25 3177.17,-2055.3 v1(3208.48,-2086.61)
  Top Layer w8: U1.AG20@1692.91,-2401.57 v1(1712.6,-2381.89)
  Layer 3 (sig) w5: v1(1712.6,-2381.89) 1719.65,-2381.89 1756,-2345.53 1817.99,-2345.53 1850.58,-2312.94 1850.58,-2107.76 1870.26,-2088.07 1870.26,-1943.88 1928.5,-1885.64 1928.5,-1873.21 2016.72,-1785 2924.14,-1785 3206.26,-2067.11 3206.26,-2084.39 v1(3208.48,-2086.61)
SRAM_DQ5: U1.AH23 U2.14 | length 2444.4
  Top Layer w5: v1(3208.66,-2125.98) 3227.98,-2106.67 3227.98,-2064.72 3208.66,-2045.41 U2.14@3208.66,-1984.25
  Top Layer w8: U1.AH23@1574.8,-2362.2 v1(1594.49,-2342.52)
  Layer 3 (sig) w5: v1(1594.49,-2342.52) 1594.49,-2345.68 1620.09,-2371.28 1668.1,-2371.28 1677.36,-2362.02 1725.37,-2362.02 1754.74,-2332.65 1764.19,-2332.65 1811.21,-2285.63 1811.21,-2132.99 1860.26,-2083.93 1860.26,-1939.74 1918.5,-1881.5 1918.5,-1869.07 2012.57,-1775 2928.28,-1775 3227.98,-2074.69 3227.98,-2106.67 v1(3208.66,-2125.98)
SRAM_DQ6: U1.AH21 U2.15 | length 2440.6
  Top Layer w5: v1(3208.66,-2165.35) 3240.16,-2133.86 U2.15@3240.16,-1984.25
  Top Layer w8: U1.AH21@1653.54,-2362.2 v1(1673.23,-2342.52)
  Layer 3 (sig) w5: v1(1673.23,-2342.52) 1692.81,-2322.94 1750.31,-2322.94 1750.6,-2322.65 1760.05,-2322.65 1771.84,-2310.86 1771.84,-2158.21 1850.26,-2079.79 1850.26,-1928.55 1908.5,-1870.31 1908.5,-1864.93 2008.43,-1765 2932.43,-1765 3237.98,-2070.55 3237.98,-2136.04 v1(3208.66,-2165.35)
SRAM_DQ7: U1.AL20 U2.16 | length 2389.6
  Top Layer w5: U1.AL20@1692.91,-2244.09 1710.85,-2226.16 1736.21,-2226.16 1751.97,-2210.4 1751.97,-2086.61 1812.22,-2026.36 1812.22,-1952.45 v1(1815.86,-1948.82) ; v1(3227.62,-2203.99) 3271.65,-2159.96 U2.16@3271.65,-1984.25
  Layer 3 (sig) w5: v1(1815.86,-1948.82) 1898.5,-1866.17 1898.5,-1860.79 2004.29,-1755 2936.57,-1755 3247.98,-2066.41 3247.98,-2183.64 v1(3227.62,-2203.99)
SRAM_DQ8: U1.AL23 U2.29 | length 2410.7
  Top Layer w5: U1.AL23@1574.8,-2244.09 v1(1594.49,-2224.41) ; v1(3208.66,-1663.39) 3248.03,-1663.39 3271.65,-1639.76 U2.29@3271.65,-1519.69
  Layer 3 (sig) w5: v1(1594.49,-2224.41) 1596.58,-2224.41 1624.15,-2196.84 1624.15,-2126.68 1635.76,-2115.06 1635.76,-2044.9 1625.64,-2034.78 1625.64,-2014.55 1606.65,-1995.56 1604.16,-1995.56 1585.17,-1976.58 1585.17,-1934.83 1986.5,-1533.5 3106.36,-1533.5 3208.66,-1635.81 v1(3208.66,-1663.39)
SRAM_DQ9: U1.AP23 U2.30 | length 2289.2
  Top Layer w5: U1.AP23@1574.8,-2125.98 1577.84,-2122.95 1577.84,-2050.2 1596.14,-2031.91 v1(1596.14,-2026.77)
  Top Layer w8: v1(3235.85,-1643.89) 3235.85,-1639.56 3249.16,-1626.25 3249.16,-1591 3240.16,-1582 U2.30@3240.16,-1519.69
  Layer 3 (sig) w5: v1(1596.14,-2026.77) 1596.14,-2024.07 1584.62,-2012.55 1584.62,-2004.31 1565.17,-1984.87 1565.17,-1926.55 1978.22,-1513.5 3155.07,-1513.5 3247.66,-1606.1 3247.66,-1628.12 3235.85,-1639.93 v1(3235.85,-1643.89)
SRAM_DQ10: U1.AJ23 U2.31 | length 2405.2
  Top Layer w8: U1.AJ23@1574.8,-2322.83 v1(1594.49,-2303.15) ; U2.31@3208.66,-1519.69 3208.66,-1594.67 v1(3228.16,-1614.17)
  Layer 3 (sig) w5: v1(1594.49,-2303.15) 1594.49,-2301.06 1574.99,-2281.56 1574.99,-2118.93 1596.61,-2097.3 1596.61,-2078.69 1615.64,-2059.66 1615.64,-2018.69 1602.51,-2005.56 1600.01,-2005.56 1575.17,-1980.72 1575.17,-1930.69 1982.36,-1523.5 3137.49,-1523.5 v1(3228.16,-1614.17)
SRAM_DQ11: U1.AN22 U2.32 | length 2128.1
  Top Layer w5: v1(1604.67,-1968.5) 1623.86,-1987.69 1623.86,-2047.01 1596.24,-2074.62 1596.24,-2147.42 U1.AN22@1614.17,-2165.35 ; v1(3169.29,-1624.02) 3169.29,-1618.87 3177.17,-1611 U2.32@3177.17,-1519.69
  Layer 3 (sig) w5: v1(1604.67,-1968.5) 1604.67,-1929.47 1990.64,-1543.5 3088.78,-1543.5 v1(3169.29,-1624.02)
SRAM_DQ12: U1.AL22 U2.35 | length 2060.3
  Top Layer w5: U1.AL22@1614.17,-2244.09 1614.46,-2244.09 v1(1634.15,-2224.41) ; v1(3031.5,-1633.86) 3082.68,-1582.68 U2.35@3082.68,-1519.69
  Layer 3 (sig) w5: v1(1634.15,-2224.41) 1634.15,-2136.72 1645.76,-2125.11 1645.76,-2040.76 1642.65,-2037.65 1642.65,-1905.64 1994.78,-1553.5 2957.79,-1553.5 3027.86,-1623.57 3027.86,-1630.22 v1(3031.5,-1633.86)
SRAM_DQ13: U1.AM21 U2.36 | length 2040
  Top Layer w5: U1.AM21@1653.54,-2204.72 v1(1673.23,-2185.04) ; v1(2992.13,-1663.39) 2992.13,-1630.67 3051.18,-1571.61 U2.36@3051.18,-1519.69
  Layer 3 (sig) w5: v1(1673.23,-2185.04) 1673.23,-2182.95 1655.76,-2165.48 1655.76,-2036.62 1652.65,-2033.51 1652.65,-1909.78 1998.93,-1563.5 2953.65,-1563.5 2992.13,-1601.98 v1(2992.13,-1663.39)
SRAM_DQ14: U1.AN21 U2.37 | length 1901.5
  Top Layer w5: U1.AN21@1653.54,-2165.35 1635.61,-2147.42 1635.61,-1965.67 v1(1672.15,-1929.13) ; v1(2972.44,-1633.86) 3019.68,-1586.61 U2.37@3019.68,-1519.69
  Layer 3 (sig) w5: v1(1672.15,-1929.13) 1672.15,-1904.42 2003.07,-1573.5 2949.51,-1573.5 2972.44,-1596.44 v1(2972.44,-1633.86)
SRAM_DQ15: U1.AK22 U2.38 | length 1960.3
  Top Layer w5: v1(2952.76,-1604.33) 2982.28,-1604.33 2988.19,-1598.43 U2.38@2988.19,-1519.69
  Top Layer w8: U1.AK22@1614.17,-2283.46 v1(1633.86,-2263.78)
  Layer 3 (sig) w5: v1(1633.86,-2263.78) 1636.33,-2263.78 1653.73,-2246.39 1653.73,-2216.33 1665.15,-2204.91 1680.94,-2204.91 1692.73,-2193.12 1692.73,-2083.94 1673.41,-2064.62 1673.41,-1955.45 1691.65,-1937.21 1691.65,-1899.07 2007.21,-1583.5 2931.93,-1583.5 v1(2952.76,-1604.33)
SRAM_L\B\: R15.2 U1.AE26 U2.39 | length 2576.2
  Top Layer w5: R15.2@2952.76,-1339.57 2956.69,-1343.5 U2.39@2956.69,-1519.69 ; R15.2@2952.76,-1338.58 v1(2992.13,-1338.58)
  Top Layer w8: U1.AE26@1456.69,-2480.32 v1(1476.38,-2460.63)
  Layer 3 (sig) w5: v1(1476.38,-2460.63) 1478.47,-2460.63 1497.28,-2441.82 1497.28,-2391 1496.25,-2389.97 1496.25,-2373.81 1497.28,-2372.78 1497.28,-2335.21 1496.25,-2334.18 1496.25,-2325.37 1476.09,-2305.21 1476.09,-1902.49 2020.5,-1358.08 2836.61,-1358.08 2856.11,-1338.58 v1(2992.13,-1338.58)
SRAM_O\E\: R8.2 U1.AE25 U2.41 | length 2480.9
  Top Layer w5: v1(2795.28,-1338.58) R8.2@2834.65,-1338.58 2893.7,-1397.64 U2.41@2893.7,-1519.69
  Top Layer w8: U1.AE25@1496.06,-2480.32 v1(1515.75,-2460.63)
  Layer 3 (sig) w5: v1(1515.75,-2460.63) 1515.75,-2462.72 1498.34,-2480.13 1468.3,-2480.13 1456.88,-2468.71 1456.88,-1907.56 2022.73,-1341.71 2792.15,-1341.71 v1(2795.28,-1338.58)
SRAM_U\B\: R11.2 U1.AG25 U2.40 | length 2372.6
  Top Layer w5: R11.2@2893.7,-1338.58 v1(2925.2,-1370.08) U2.40@2925.2,-1519.69
  Top Layer w8: U1.AG25@1496.06,-2401.57 v1(1515.75,-2381.89)
  Layer 3 (sig) w5: v1(1515.75,-2381.89) 1517.84,-2379.8 1517.84,-2332.81 1486.09,-2301.07 1486.09,-1906.64 2022.65,-1370.08 v1(2925.2,-1370.08)
SRAM_W\E\: R18.2 U1.AJ20 U2.17 | length 2553.3
  Top Layer w5: v1(3248.03,-2224.59) 3249.77,-2224.59 3262.69,-2211.67 3291.28,-2211.67 3294.35,-2208.6 3294.35,-2012.24 3303.15,-2003.44 U2.17@3303.15,-1984.25
  Top Layer w8: U1.AJ20@1692.91,-2322.83 1693.2,-2322.83 1712.6,-2303.44 v1(1712.89,-2303.44)
  Layer 3 (sig) w5: v1(1712.89,-2303.44) 1714.66,-2303.44 1741.39,-2276.71 1750.83,-2276.71 1761.84,-2265.7 1761.84,-2132.03 1773.93,-2119.94 1773.93,-1986.27 1796.36,-1963.84 1796.36,-1940.74 1992.1,-1745 2940.71,-1745 3257.98,-2062.27 3257.98,-2187.78 3248.03,-2197.72 v1(3248.03,-2224.59)
USB_CLK0: J1.A79 U1.C24 | length 2104.7
  Top Layer w5: v1(-45,-3940) -22.68,-3940 22.32,-3895 1196.91,-3895 1535.43,-3556.48 1535.43,-3464.57 1515.75,-3444.88 1515.75,-3366.14 U1.C24@1535.43,-3346.46
  Bottom Layer w5: J1.A79@-177.17,-3956.69 -61.69,-3956.69 v1(-45,-3940)
USERIOA-1: J6.1 U1.C14 | length 1871.7
  Top Layer w5: U1.C14@1929.13,-3346.46 1948.82,-3366.14 1985.26,-3366.14 1988.19,-3369.07 1988.19,-3463.74 2007.87,-3483.42 2007.87,-4303.53 2015.37,-4311.02 2863.98,-4311.02 J6.1@2865,-4310
USERIOA-3: J6.3 U1.B14 | length 1881.6
  Top Layer w5: U1.B14@1929.13,-3385.83 1949.56,-3406.26 1949.56,-3470.71 1967.04,-3488.19 1967.04,-4349.41 1976.11,-4358.48 2863.48,-4358.48 J6.3@2865,-4360
USERIOA-5: J6.5 U1.A14 | length 1908.4
  Top Layer w5: U1.A14@1929.13,-3425.2 1929.13,-3476.36 1940.96,-3488.19 1940.96,-4400.97 1949.19,-4409.2 2864.2,-4409.2 J6.5@2865,-4410
USERIOA-7: J6.7 U1.B15 | length 2030.7
  Top Layer w5: U1.B15@1889.76,-3385.83 1909.45,-3405.51 1909.45,-4447.3 1922.46,-4460.31 2864.69,-4460.31 J6.7@2865,-4460
USERIOA-9: J6.9 U1.A15 | length 2048.7
  Top Layer w5: U1.A15@1889.76,-3425.2 1889.76,-4490.7 1906.93,-4507.87 2862.87,-4507.87 J6.9@2865,-4510
USERIOA-11: J6.11 U1.B16 | length 2169.8
  Top Layer w5: U1.B16@1850.39,-3385.83 1870.08,-3405.51 1870.08,-4547.24 1882.37,-4559.53 2864.53,-4559.53 J6.11@2865,-4560
USERIOA-12: J6.12 U1.G20 | length 2903.2
  Top Layer w5: U1.G20@1692.91,-3188.98 v1(1712.6,-3208.66) ; J6.12@3025,-4560 v1(3130,-4560)
  Layer 4 (sig) w5: v1(1712.6,-3208.66) 1732.28,-3228.35 1732.28,-3296.65 1712.91,-3316.02 1712.91,-3436.56 1710,-3439.47 1710,-3615.86 1724.5,-3630.36 1724.5,-3690.5 1685,-3730 1635,-3730 1632.07,-3732.93 1632.07,-3778.61 1630,-3780.68 1630,-4265 1925,-4560 v1(3130,-4560)
USERIOA-13: J6.13 U1.A18 | length 2206.3
  Top Layer w5: U1.A18@1771.65,-3425.2 1771.65,-3503.94 1771.65,-3678.37 1850.52,-3757.24 1850.52,-4565.79 1895,-4610.26 2864.74,-4610.26 J6.13@2865,-4610
USERIOA-14: J6.14 U1.F20 | length 2914.4
  Top Layer w5: U1.F20@1692.91,-3228.35 v1(1712.6,-3248.03) ; J6.14@3025,-4610 v1(3130,-4610)
  Layer 4 (sig) w5: v1(1712.6,-3248.03) 1693.1,-3267.53 1693.1,-3301.51 1702.91,-3311.33 1702.91,-3432.41 1696.46,-3438.87 1696.46,-3616.46 1714.5,-3634.5 1714.5,-3686.36 1680.86,-3720 1630,-3720 1622.07,-3727.93 1622.07,-3774.47 1620,-3776.54 1620,-4300 1930,-4610 v1(3130,-4610)
USERIOA-15: J6.15 U1.C19 | length 2374.4
  Top Layer w5: U1.C19@1732.28,-3346.46 v1(1751.97,-3366.14) ; v1(1754,-3690) 1757.64,-3693.64 1772.78,-3693.64 1840.52,-3761.38 1840.52,-4605.52 1900.35,-4665.35 2769.79,-4665.35 2773.91,-4661.23 2863.77,-4661.23 J6.15@2865,-4660
  Layer 4 (sig) w5: v1@1750.36,-3686.36 v1(1754,-3690) 1757.64,-3686.36 1757.64,-3677.37 1760,-3675 1760,-3653.01 1760,-3485.47 1751.97,-3477.44 v1(1751.97,-3366.14)
USERIOA-16: J6.16 U1.E20 | length 2960.4
  Top Layer w5: v1(1673.23,-3248.03) U1.E20@1692.91,-3267.72 ; J6.16@3025,-4660 v1(3130,-4660)
  Layer 4 (sig) w5: v1(1673.23,-3248.03) 1673.23,-3295.78 1692.91,-3315.47 1692.91,-3384.06 1685,-3391.97 1685,-3619.14 1704.5,-3638.64 1704.5,-3682.22 1676.72,-3710 1620,-3710 1610,-3720 1610,-4325 1935,-4650 2969.89,-4650 2979.89,-4660 v1(3130,-4660)
USERIOA-17: J6.17 U1.A19 | length 2350.9
  Top Layer w5: U1.A19@1732.28,-3425.2 1732.28,-3464.57 1714.5,-3482.35 1714.5,-3682.08 1762.92,-3730.5 1795.5,-3730.5 1830.52,-3765.52 1830.52,-4636.02 1905,-4710.49 2864.51,-4710.49 J6.17@2865,-4710
USERIOA-18: J6.18 U1.B20 | length 2835.9
  Top Layer w5: v1(1685,-3660) 1685,-3465.31 1671.65,-3451.97 1671.65,-3407.09 U1.B20@1692.91,-3385.83 ; J6.18@3025,-4710 v1(3130,-4710)
  Layer 4 (sig) w5: v1(1685,-3660) 1625,-3660 1600,-3685 1600,-4355 1935,-4690 2975,-4690 2995,-4710 v1(3130,-4710)
USERIOA-21: J6.21 U1.H18 | length 2672.8
  Top Layer w5: U1.H18@1771.65,-3149.61 v1(1791.34,-3169.33) ; v1(1805,-3775) 1820.52,-3790.52 1820.52,-4640.16 1825,-4644.64 1825,-4693.45 1875.65,-4744.09 2695.1,-4744.09 2763.89,-4812.89 2862.11,-4812.89 J6.21@2865,-4810
  Layer 4 (sig) w5: v1(1791.34,-3169.33) 1771.84,-3188.79 1771.84,-3399.45 1781.34,-3408.95 1781.34,-3476.6 1785,-3480.26 1785,-3665 1804.99,-3684.99 v1(1805,-3775)
USERIOA-23: J6.23 U1.F19 | length 2658.8
  Top Layer w5: U1.F19@1732.28,-3228.35 1732.57,-3228.35 1751.5,-3247.27 v1(1751.78,-3247.27) ; v1(1775,-3750) 1775,-3785.86 1805,-3815.86 1805,-4638.78 1815,-4648.78 1815,-4715 1942.52,-4842.52 2736.22,-4842.52 2755.91,-4862.2 2862.8,-4862.2 J6.23@2865,-4860
  Layer 4 (sig) w5: v1(1751.78,-3247.27) 1751.21,-3247.85 1751.21,-3293.28 1727.63,-3316.86 1727.63,-3435.98 1720.76,-3442.85 1720.76,-3566.73 1734.5,-3580.47 1734.5,-3709.5 v1(1775,-3750)
USERIOA-24: J6.24 U1.D20 | length 2971
  Top Layer w5: v1(1673.23,-3326.77) U1.D20@1692.91,-3307.09 ; J6.24@3025,-4860 3025.71,-4860.71 v1(3125.25,-4860.71)
  Layer 4 (sig) w5: v1(1673.23,-3326.77) 1673.23,-3331.91 1663.73,-3341.41 1663.73,-3348.06 1653.73,-3358.06 1653.73,-3434.24 1675,-3455.51 1675,-3550 1645,-3580 1645,-3625.86 1590,-3680.86 1590,-4385 1945,-4740 2675,-4740 2795.71,-4860.71 v1(3125.25,-4860.71)
USERIOA-25: J6.25 U1.C18 | length 2612.7
  Top Layer w5: U1.C18@1771.65,-3346.46 v1(1791.34,-3366.14) ; v1(1773.28,-3811.72) 1776.92,-3815.35 1790.35,-3815.35 1795,-3820 1795,-4677.59 1805,-4687.59 1805,-4735 1980,-4910 J6.25@2865,-4910
  Layer 4 (sig) w5: v1(1773.28,-3811.72) 1776.92,-3808.08 1792.2,-3808.08 1795.28,-3805 1820,-3805 1829.5,-3795.5 1829.5,-3554.5 1795,-3520 1795,-3476.12 1791.34,-3472.46 v1(1791.34,-3366.14)
USERIOA-26: J6.26 U1.G21 | length 3128.7
  Top Layer w5: U1.G21@1653.54,-3188.98 v1(1673.23,-3208.66) ; J6.26@3025,-4910 v1(3125,-4910)
  Layer 4 (sig) w5: v1(1673.23,-3208.66) 1653.73,-3228.16 1653.73,-3343.92 1643.73,-3353.92 1643.73,-3486.18 1634.04,-3495.86 1634.04,-3622.67 1580,-3676.72 1580,-4425 1945,-4790 2650,-4790 2770,-4910 v1(3125,-4910)
USERIOA-27: J6.27 U1.B19 | length 2570.7
  Top Layer w5: U1.B19@1732.28,-3385.83 1712.6,-3405.51 1712.6,-3464.57 1704.5,-3472.67 1704.5,-3770.51 1780.5,-3846.51 1780.5,-4735.5 2005.63,-4960.63 2864.37,-4960.63 J6.27@2865,-4960
USERIOA-28: J6.28 U1.D21 | length 3055.7
  Top Layer w5: v1(1633.49,-3326.84) 1633.64,-3326.84 1653.39,-3307.09 U1.D21@1653.54,-3307.09 ; J6.28@3025,-4960 v1(3125,-4960)
  Layer 4 (sig) w5: v1(1633.49,-3326.84) 1633.49,-3482.27 1624.04,-3491.72 1624.04,-3618.53 1570,-3672.57 1570,-4470 1970,-4870 2675,-4870 2765,-4960 v1(3125,-4960)
USERIOA-29: J6.29 U1.D14 | length 2813.1
  Top Layer w5: v1(1760,-3895) 1760,-4775 1995,-5010 J6.29@2865,-5010 ; U1.D14@1929.13,-3307.09 v1(1948.82,-3326.77) v1@1949.16,-3326.77
  Layer 4 (sig) w5: v1(1760,-3895) 1830,-3895 1910,-3815 1910,-3601.81 1967.04,-3544.77 1967.04,-3344.99 v1(1948.82,-3326.77)
USERIOA-30: J6.30 U1.G22 | length 3236.6
  Top Layer w5: U1.G22@1614.17,-3188.98 v1(1633.86,-3208.66) ; J6.30@3025,-5010 v1(3125,-5010)
  Layer 4 (sig) w5: v1(1633.86,-3208.66) 1633.86,-3213.8 1623.99,-3223.67 1623.99,-3230.32 1614.36,-3239.95 1614.36,-3267.16 1614.65,-3267.46 1614.65,-3306.46 1613.99,-3307.12 1613.99,-3334.92 1615.89,-3336.82 1615.89,-3472.64 1614.04,-3474.49 1614.04,-3545.96 1560,-3600 1560,-4515 1965,-4920 2670,-4920 2760,-5010 v1(3125,-5010)
USERIOA-31: J6.31 U1.D15 | length 2954.4
  Top Layer w5: v1(1735,-3930) 1735,-4795 1979.46,-5039.46 2735.37,-5039.46 2755.91,-5060 J6.31@2865,-5060 ; U1.D15@1889.76,-3307.09 v1(1909.45,-3326.77)
  Layer 4 (sig) w5: v1(1735,-3930) 1695,-3930 1682.4,-3917.4 1682.4,-3872.15 1695.05,-3859.5 1830.5,-3859.5 1880,-3810 1880,-3590 1889.76,-3580.24 1889.76,-3346.46 v1(1909.45,-3326.77)
USERIOA-32: J6.32 U1.F23 | length 3313.4
  Top Layer w5: U1.F23@1574.8,-3228.35 v1(1594.49,-3208.66) ; J6.32@3025,-5060 v1(3125,-5060)
  Layer 4 (sig) w5: 1574.99,-3454.99 1574.99,-3279.21 1594.36,-3259.84 1594.36,-3231.67 1594.49,-3231.54 v1(1594.49,-3208.66) ; 1575,-3455 1575,-3474.47 1600,-3499.47 1600,-3530 1550,-3580 1550,-4575 1930,-4955 2620,-4955 2730,-5065 3085,-5065 3090,-5060 v1(3125,-5060)
USERIOA-33: J6.33 U1.E15 | length 3001.8
  Top Layer w5: v1(1707.3,-3901.03) 1705,-3903.33 1705,-4795 1969.06,-5059.06 2696.85,-5059.06 2747.8,-5110 J6.33@2865,-5110 ; U1.E15@1889.76,-3267.72 v1(1909.45,-3287.4)
  Layer 4 (sig) w5: v1(1707.3,-3901.03) 1707.3,-3897.7 1730,-3875 1830,-3875 1895,-3810 1895,-3597.13 1948.82,-3543.31 1948.82,-3366.14 1929.32,-3346.64 1929.32,-3307.27 v1(1909.45,-3287.4)
USERIOA-35: J6.35 U1.F14 | length 3149.2
  Top Layer w5: v1(1680,-3960) 1680,-4375.07 1670,-4385.07 1670,-4795 1955,-5080 2678.43,-5080 2758.43,-5160 J6.35@2865,-5160 ; U1.F14@1929.13,-3228.35 v1(1948.82,-3248.03)
  Layer 4 (sig) w5: v1(1680,-3960) 1830,-3960 1945,-3845 1945,-3586.5 1978.84,-3552.65 1978.84,-3278.06 v1(1948.82,-3248.03)